# Altium PCB final_arm.PcbDoc
Units mil, origin at the board's own origin, x right, y up, seen from the top; angles counter-clockwise.
Board outline 7091.73 x 6137.99 mil, 2 copper layers (Top Layer, Bottom Layer); 35 components, 57 nets, 275 pads, 0 vias.
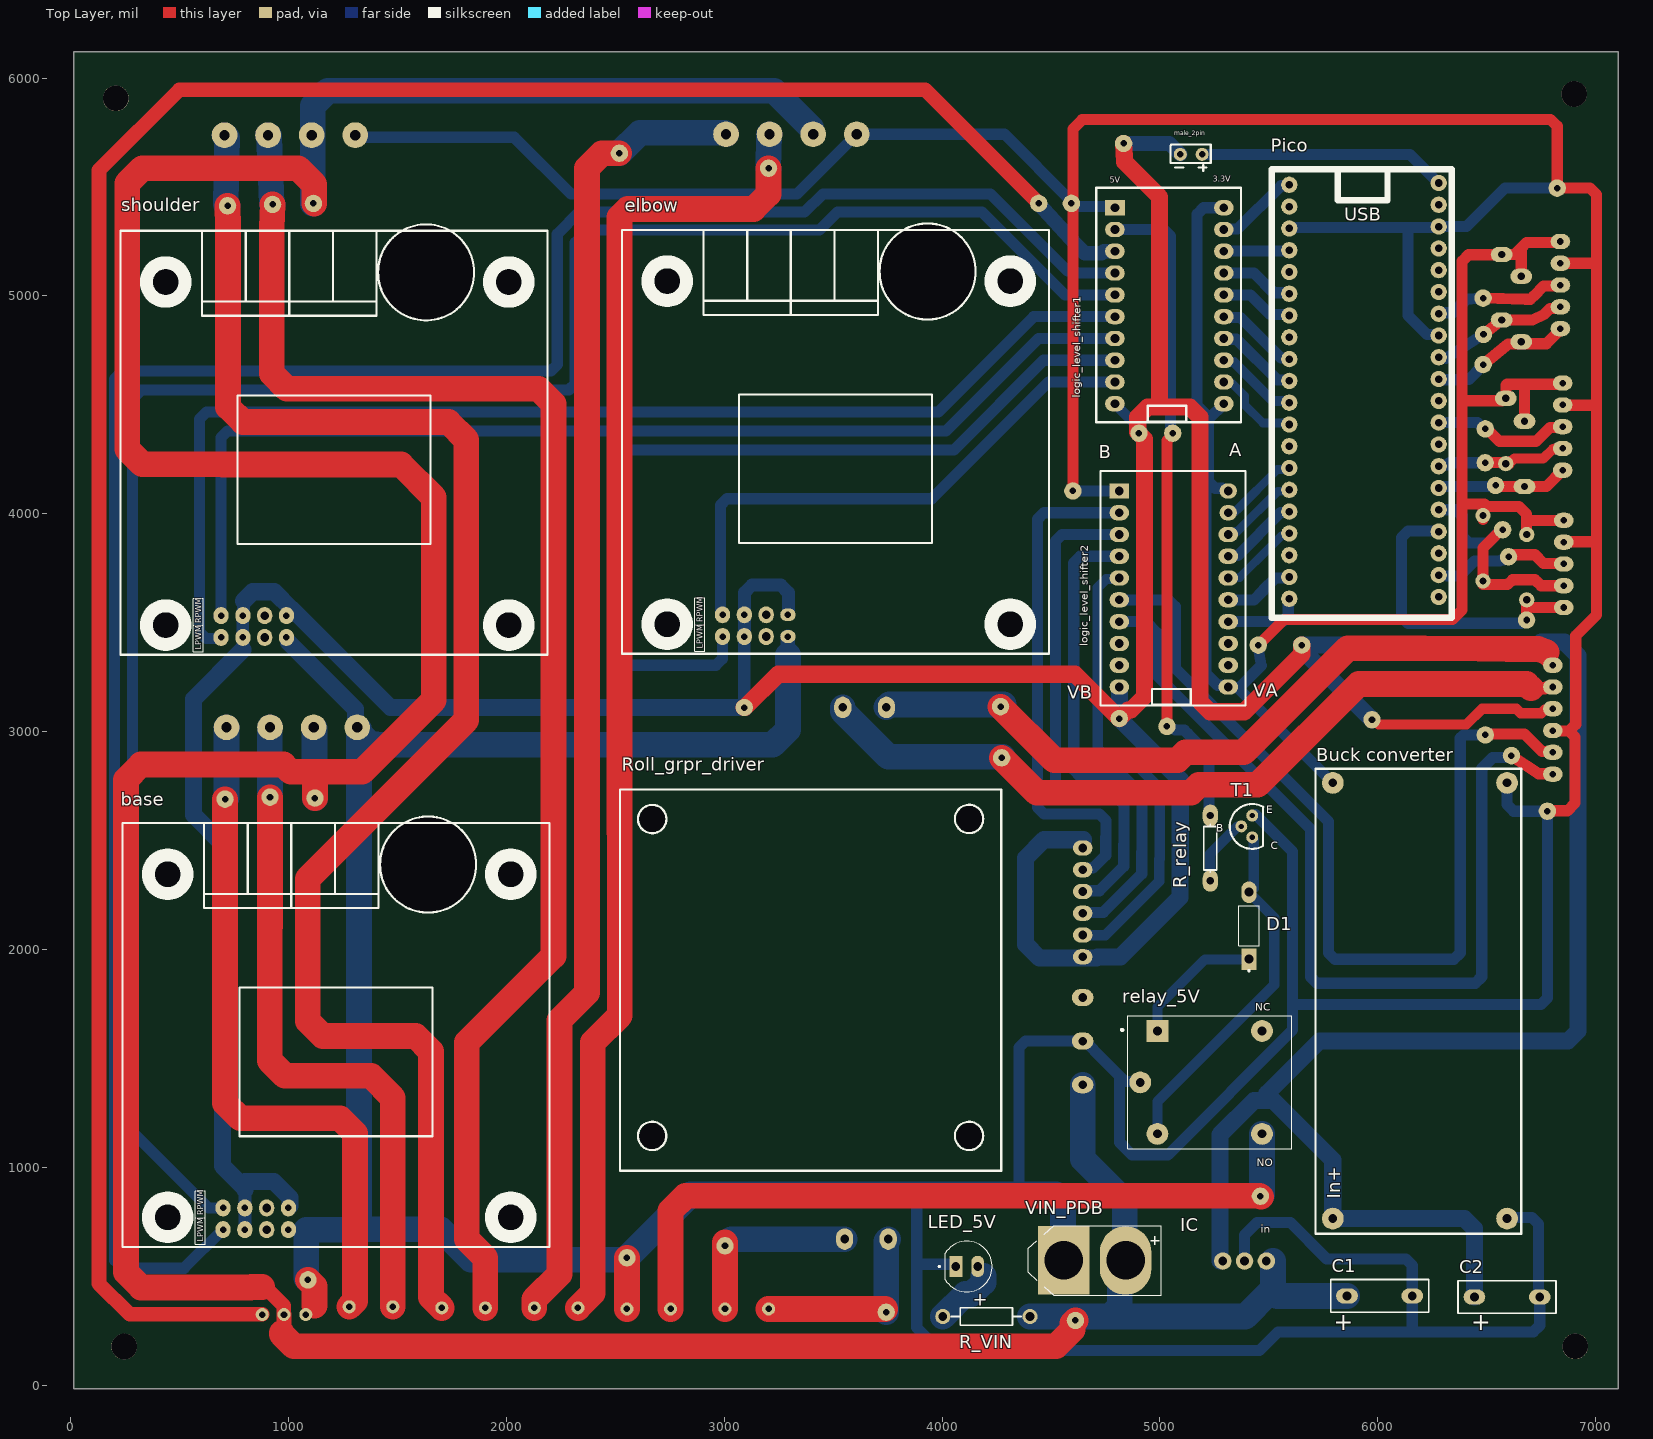
[diagram p0: Top Layer view]
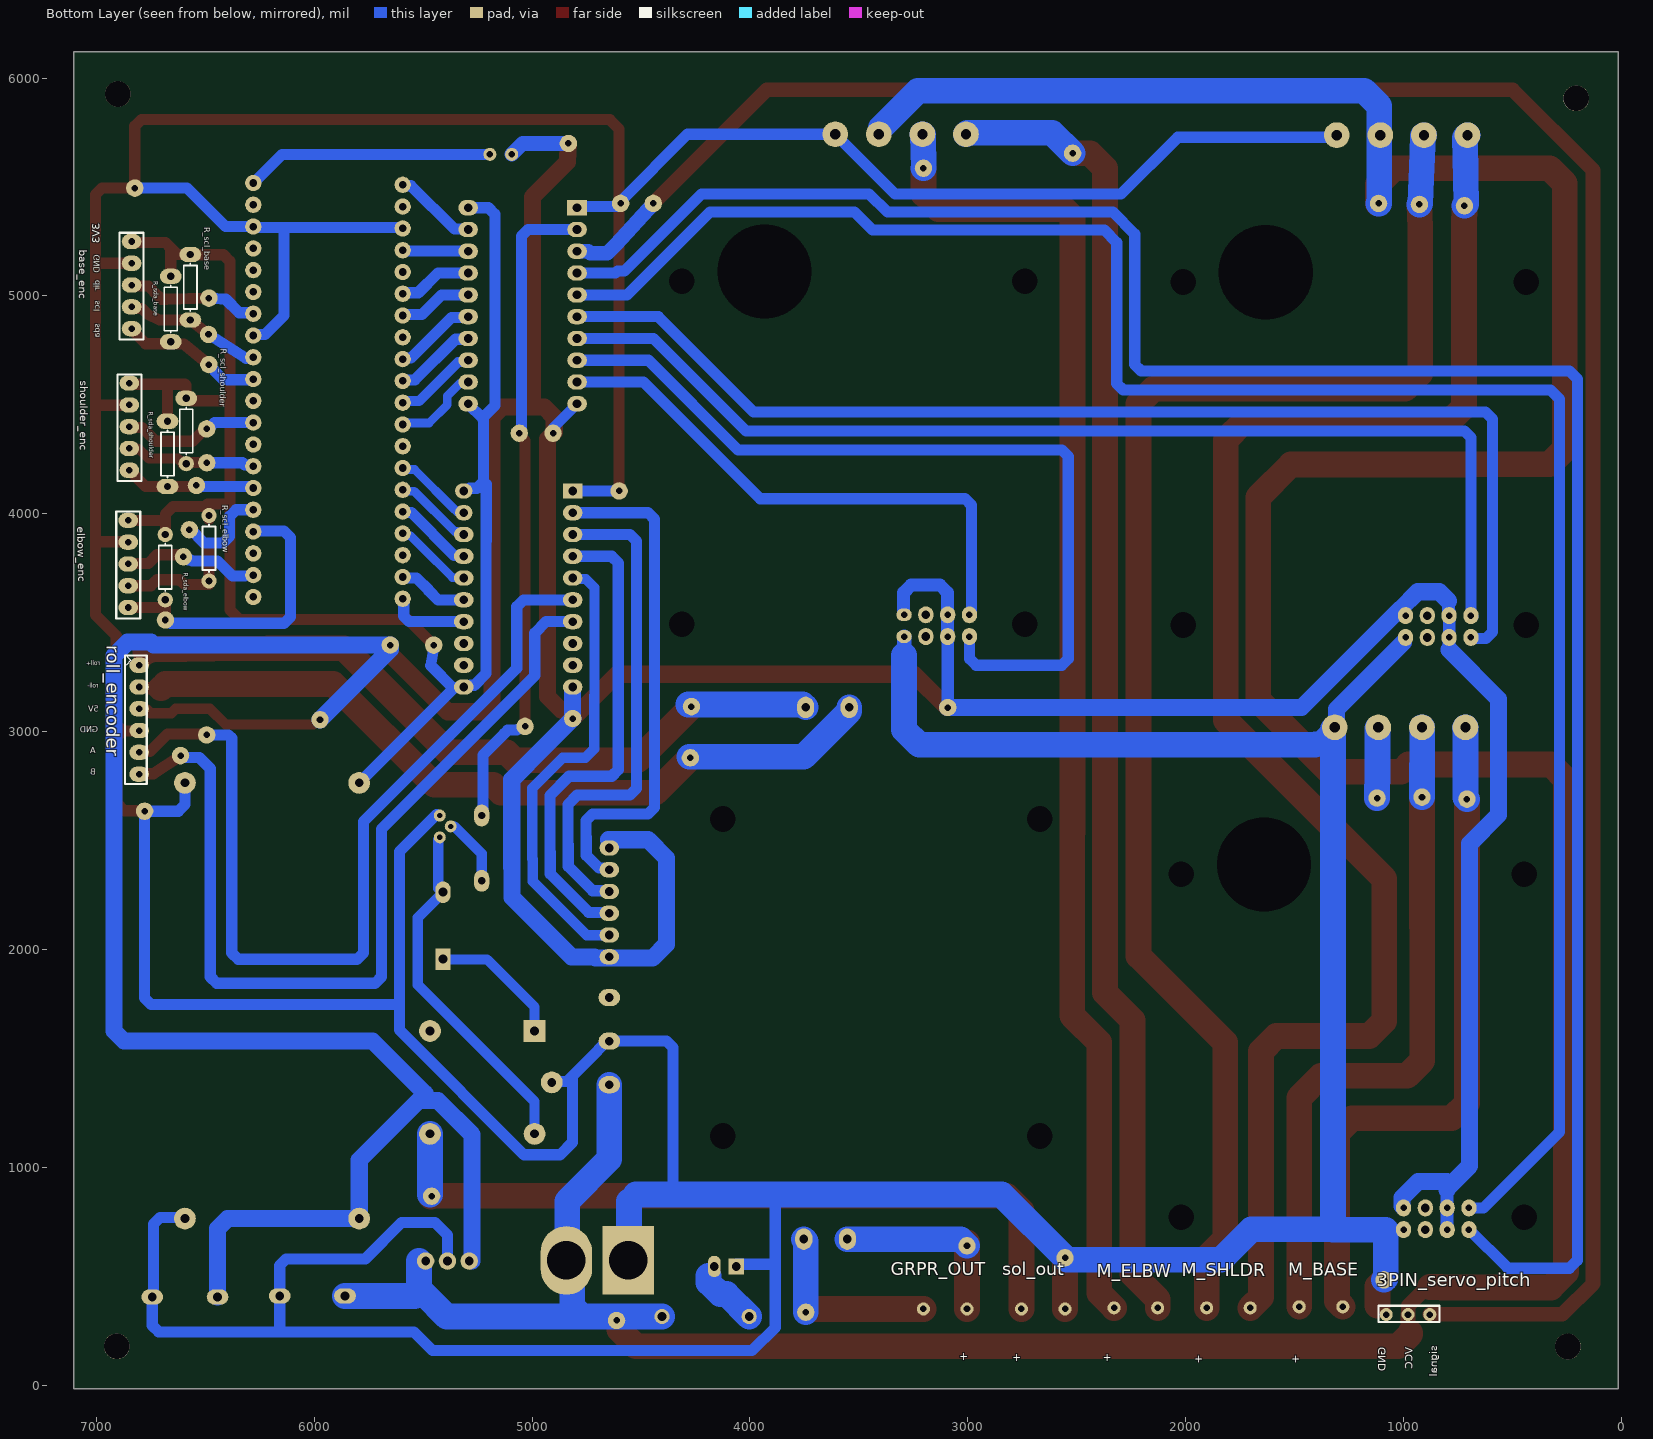
[diagram p1: Bottom Layer view, seen from below]

## Layer stack, top to bottom
Top Solder: solder mask 0.4, Solder Resist, Dk 3.5
Top Layer: signal copper 1.4
Dielectric 1: dielectric 12.6, FR-4, Dk 4.8
Bottom Layer: signal copper 1.4
Bottom Solder: solder mask 0.4, Solder Resist, Dk 3.5

## Board outline
13.31,-16.14 7105.04,-16.14 7105.04,6121.85 13.31,6121.85

## Design rules (kind name [scope] priority, off if disabled: settings)
Clearance [All] p1: gap=31.5 ignorepadtopadclearanceinfootprint=TRUE
Height [All] p1 off: minheight=0 maxheight=1000 prefheight=500
HoleSize [All] p1: absolutevalues=TRUE maxlimit=118.11 minlimit=1 maxpercent=80.000 minpercent=20.000
PolygonConnect [All] p1: connectstyle=Relief reliefconductorwidth=10 reliefentries=4 polygonreliefangle="90 Angle" airgapwidth=10
RoutingVias [All] p1: holewidth=28 width=50 viastyle="Through Hole" minholewidth=28 minwidth=50 maxholewidth=28 maxwidth=50
SolderMaskExpansion [All] p1: expansion=4 istentingtop=FALSE
Width [All] p1: maxlimit=157.48 minlimit=31.5 preferedwidth=39.37
28 further rules are at their usual default settings.

## Classes and differential pairs
net class HV: 12V_VCC BASE_M+ BASE_M- ELBOW_M+ ELBOW_M- SHOULDER_M+ SHOULDER_M-

## Components (designator, comment, footprint, x,y, rotation, side; value= is the part's Value field where it differs from the comment)
3PIN_servo_pitch "JST_3PIN_MALE" JST_3PIN_MALE 879.45,324.29 r0 bottom
base "BTS7960 DRIVER BOARD" BTS7960_DRIVER_BOARD#1 715.55,2389.76 r90 top
base_enc "5_pin_jst" 5pin_jst 6838.74,4849.8 r90 bottom
"Buck converter" "XL4015" XL4015_BL 5793.74,764.8 r90 top
C1 "Cap" RAD-0.3 6008.74,409.8 r0 top value=330pF
C2 "Cap" RAD-0.3 6593.74,404.8 r180 top value=100pF
D1 "1N4007-T" DIOAD780W78L463D236 5408.82,2109.33 r90 top
elbow "BTS7960 DRIVER BOARD" BTS7960_DRIVER_BOARD#2 3008.43,5112.32 r90 top
elbow_enc "5_pin_jst" 5pin_jst 6853.74,3569.8 r90 bottom
GRPR_OUT "KF2510_3P_motor_pin" PCBComponent_1 3003.74,349.8 r0 bottom
IC "LM7805" LM7805 5488.74,569.8 r180 top
LED_5V "L08R5000Q1" LEDRD254W57D500H1070 4113.74,544.8 r0 top
logic_level_shifter1 "TXS0108E 8" llshifter#1 5293.74,4504.8 r180 top
logic_level_shifter2 "TXS0108E 8" llshifter#2 5313.74,3204.8 r180 top
M_BASE "KF2510_3P_motor_pin" PCBComponent_1 1278.74,359.8 r0 bottom
M_ELBW "KF2510_3P_motor_pin" PCBComponent_1 2128.74,354.8 r0 bottom (schematic designator M_ELBOW)
M_SHLDR "KF2510_3P_motor_pin" PCBComponent_1 1703.74,354.8 r0 bottom (schematic designator M_SHOULDER)
male_2pin "alt power pico" 2pin_header 5093.74,5649.8 r0 top
Pico "Component_1_1" "PCBComponent_1 - duplicate" 5918.74,4369.8 r0 top
R_relay "scl_base" AXIAL-0.3#1 5231.61,2465 r90 top value=4.7K
R_scl_base "scl_base" AXIAL-0.3#2 6568.74,5039.8 r90 bottom value=4.7K
R_scl_elbow "" AXIAL-0.3#3 6482.99,3841.85 r90 bottom value=4.7K
R_scl_shoulder "Res1" AXIAL-0.3#4 6587.72,4379.96 r90 bottom value=4.7K
R_sda_base "Res1" AXIAL-0.3#2 6658.74,4939.8 r90 bottom value=4.7K
R_sda_elbow "Res1" AXIAL-0.3#3 6683.74,3754.8 r90 bottom value=4.7K
R_sda_shoulder "" AXIAL-0.3#2 6673.74,4274.8 r90 bottom value=4.7K
R_VIN "Res2" AXIAL-0.4 4203.74,314.8 r0 top value=330
relay_5V "SRD-05VDC-SL-C" RELAY_SRD-05VDC-SL-C 5228.74,1389.8 r0 top
roll_encoder "JST_6PIN_MALE" jst_6pin_male 6803.74,3304.8 r270 bottom
Roll_grpr_driver "L298Nog" l298nog 4094.41,1379.13 r180 top
shoulder "BTS7960 DRIVER BOARD" BTS7960_DRIVER_BOARD#1 706.42,5108.25 r90 top
shoulder_enc "5_pin_jst" 5pin_jst 6848.74,4199.8 r90 bottom
sol_out "KF2510_3P" PCBComponent_1 2553.74,349.8 r0 bottom (schematic designator solenoid_out)
T1 "BC547" TO92 5423.74,2514.8 r90 top
VIN_PDB "XT60 MALE" "XT60 MALE" 4559.02,572.76 r0 top

## Footprints (in the part's own frame and the unit in brackets; to place one, negate y for a bottom-side part, rotate by r counter-clockwise, add the part's x,y. Pads: shape width x height; smd on the part's side, far side on the other; paste and mask are expansions set on the pad)
2pin_header [mil]
  round 60 hole 30: 1(0,0) 2(100,0)
  silkscreen extent -45,-75 140,45, body extent -50,-50 150,50, height 374
5pin_jst [mil]
  oval 70x90 hole 30: 1(0,0) 2(100,0) 3(200,0) 4(300,0) 5(400,0)
  silkscreen extent -50,-55 440,55, body extent -98,-90 489,142, height 281
AXIAL-0.3#1 [mil] "Axial Device, Thru-Hole; 2 Leads; 0.3 in Pin Spacing"
  oval 100x70 hole 33.46: 1(-150,0) 2(150,0)
  silkscreen extent -109,-30 109,30
AXIAL-0.3#2 [mil] "Axial Device, Thru-Hole; 2 Leads; 0.3 in Pin Spacing"
  oval 70x100 hole 33.46: 1(-150,0) 2(150,0)
  silkscreen extent -109,-30 109,30
AXIAL-0.3#3 [mil] "Axial Device, Thru-Hole; 2 Leads; 0.3 in Pin Spacing"
  round 70 hole 33.46: 1(-150,0) 2(150,0)
  silkscreen extent -109,-30 109,30
AXIAL-0.3#4 [mil] "Axial Device, Thru-Hole; 2 Leads; 0.3 in Pin Spacing"
  round 70 hole 33.46: 1(-150,0)
  oval 70x100 hole 33.46: 2(150,0)
  silkscreen extent -109,-30 109,30
AXIAL-0.4 [mil] "Axial Device, Thru-Hole; 2 Leads; 0.4 in Pin Spacing"
  round 70 hole 40: 1(-200,0) 2(200,0)
  silkscreen extent -160,-40 160,40
BTS7960_DRIVER_BOARD#1 [mm]
  oval 1.981x1.778 hole 0.76: 1(-42.567,0.4) 2(-40.027,0.4) 3(-42.567,-2.14) 4(-40.027,-2.14) 7(-42.567,-7.22) 8(-40.027,-7.22)
  oval 1.981x1.778 hole 1.02: 5(-42.567,-4.68) 6(-40.027,-4.68)
  round 3 hole 1.2: 9(16,0) 10(16,-5.08) 11(16,-10.16) 12(16,-15.24)
  round 0 hole 3 unplated: ""(-41.127,-33.14) ""(-41.127,6.86) ""(-1.127,6.86) ""(-1.127,-33.14)
  round 0 all layers, no hole: ""(-23.009,-12.808)
  round 0 hole 11 unplated: ""(0,-23.5)
  silkscreen extent -44.58,-37.64 5.6,12.11, body extent -44.67,-38.45 5.13,12.55, height 25
BTS7960_DRIVER_BOARD#2 [mm]
  oval 1.981x1.778 hole 0.76: 1(-42.567,0.4) 2(-40.027,0.4) 3(-42.567,-2.14) 4(-40.027,-2.14)
  oval 1.981x1.778 hole 1.02: 5(-42.567,-4.68) 6(-40.027,-4.68)
  oval 1.5x1.8 hole 0.76: 7(-42.567,-7.22) 8(-40.027,-7.22)
  round 3 hole 1.2: 9(16,0) 10(16,-5.08) 11(16,-10.16) 12(16,-15.24)
  round 0 hole 3 unplated: ""(-41.127,-33.14) ""(-41.127,6.86) ""(-1.127,6.86) ""(-1.127,-33.14)
  round 0 all layers, no hole: ""(-23.009,-12.808)
  round 0 hole 11 unplated: ""(0,-23.5)
  silkscreen extent -44.58,-37.64 5.6,12.11, body extent -44.67,-38.45 5.13,12.55, height 25
DIOAD780W78L463D236 [mil]
  oval 100x70 hole 41.73: A(153.72,0)
  rect 100x70 hole 41.73: K(-153.72,0)
  silkscreen extent -211,-46 91,46, body extent -216,-53 216,53, height 106
JST_3PIN_MALE [mil]
  round 60 hole 30: 1(0,0) 2(100,0) 3(200,0)
  silkscreen extent -45,-40 235,35, body extent -92,-98 292,132, height 284
jst_6pin_male [mil]
  oval 70x90 hole 30: 1(0,0) 2(100,0) 3(200,0) 4(300,0) 5(400,0) 6(500,0)
  silkscreen extent -45,-65 545,35, body extent -82,-100 602,130, height 284
l298nog [mm]
  oval 2x2.5 hole 1.02: 1(13.75,18) 2(8.67,18) 14(8.89,-44) 15(13.97,-44)
  oval 2.5x2 hole 1.02: 3(-14,0) 4(-14,-5.08) 5(-14,-10.16)
  oval 2.286x1.778 hole 1.016: 7(-14,-14.91) 8(-14,-17.45) 9(-14,-19.99) 10(-14,-22.53) 11(-14,-25.07) 12(-14,-27.61)
  round 0 hole 3 unplated: ""(-0.762,5.969) ""(-0.762,-30.988) ""(36.195,5.969) ""(36.195,-30.988)
  silkscreen extent -4.5,-34.42 39.95,10.03, body extent -16.33,-46.06 39.87,20.4, height 26.52
LEDRD254W57D500H1070 [mm]
  oval 1.5x2.5 hole 1: A(1.27,0)
  rect 1.5x2.5 / inner round 1.815 / far side rect 1.815x1.815 hole 1: C(-1.27,0)
  silkscreen extent -3.3,-2.96 2.96,2.96, body extent -2.6,-2.95 2.95,2.95, height 9.1
llshifter#1 [mil]
  oval 90x70 hole 40: 1(0,0) 2(0,-100) 3(0,-200) 4(0,-300) 5(0,-400) 6(0,-500) 7(0,-600) 8(0,-700) 9(0,-800) 10(0,-900) 12(500,-800) 13(500,-700) 14(500,-600) 15(500,-500) 16(500,-400) 17(500,-300) 18(500,-200) 19(500,-100) 20(500,0)
  rect 90x70 hole 40: 11(500,-900)
  silkscreen extent -79,-992 586,85, body extent -68,-987 578,60, height 117
llshifter#2 [mil]
  oval 90x70 hole 40: 1(0,0) 2(0,-100) 3(0,-200) 4(0,-300) 5(0,-400) 6(0,-500) 7(0,-600) 8(0,-700) 12(500,-800) 13(500,-700) 14(500,-600) 15(500,-500) 16(500,-400) 17(500,-300) 18(500,-200) 19(500,-100) 20(500,0)
  oval 80x70 hole 40: 9(0,-800) 10(0,-900)
  rect 90x70 hole 40: 11(500,-900)
  silkscreen extent -79,-992 586,85, body extent -68,-987 578,60, height 117
LM7805 [mil]
  round 80 hole 40.16: 1(0,0) 2(100,0) 3(200,0)
  body extent -174,-107 405,307, height 1022
PCBComponent_1 [mil]
  round 60 hole 30: 1(0,0) 2(200,0)
  body extent -62,-110 272,126, height 492
"PCBComponent_1 - duplicate" [mm]
  round 1.905 hole 0.889: 1(-8.245,28.96) 1(-8.245,28.96) 2(-8.245,26.42) 3(-8.245,23.88) 4(-8.245,21.34) 5(-8.245,18.8) 6(-8.245,16.26) 7(-8.245,13.72) 8(-8.245,11.18) 9(-8.245,8.64) 10(-8.245,6.1) 11(-8.245,3.56) 12(-8.245,1.02) 13(-8.245,-1.52) 14(-8.245,-4.06) 15(-8.245,-6.6) 16(-8.245,-9.14) 17(-8.245,-11.68) 18(-8.245,-14.22) 19(-8.245,-16.76) 20(-8.245,-19.3) 21(9.17,29.173) 21(9.17,29.173) 22(9.17,26.633) 23(9.17,24.093) 24(9.17,21.553) 25(9.17,19.013) 26(9.17,16.473) 27(9.17,13.933) 28(9.17,11.393) 29(9.17,8.853) 30(9.17,6.313) 31(9.17,3.773) 32(9.17,1.233) 33(9.17,-1.307) 34(9.17,-3.847) 35(9.17,-6.387) 36(9.17,-8.927) 37(9.17,-11.467) 38(9.17,-14.007) 39(9.17,-16.547) 40(9.17,-19.087)
  silkscreen extent -10.28,-21.54 10.68,30.79, body extent -9.96,-20.4 11.03,32.03, height 4.19
RAD-0.3 [mil] "Radial Cap, Thru-Hole; 2 Leads; 0.3 in Pin Spacing"
  oval 100x70 hole 40: 1(-150,0) 2(150,0)
  silkscreen extent -225,-75 225,75
RELAY_SRD-05VDC-SL-C [mm]
  rect 2.54x2.54 hole 1.016: A1(-6.1,6)
  round 2.54 hole 1.016: A2(-6.1,-6) COM(-8.1,0) NC(6.1,6) NO(6.1,-6)
  silkscreen extent -10.3,-7.75 9.55,7.75, body extent -9.6,-7.8 9.6,7.8, height 15.8
TO92 [mil]
  round 55 hole 24: 1(0,0) 2(50,50) 3(100,0)
  silkscreen extent -53,-51 153,103, body extent -111,-56 111,86, height 345
XL4015_BL [mil]
  round 100 hole 40: 1(0,0) 2(0,-800) 3(2000,0) 4(2000,-800)
  silkscreen extent -70,-865 2065,80, body extent -71,-868 2055,77, height 578
"XT60 MALE" [mm]
  rect 6x8 hole 4.5: 1(0,0)
  oval 6x8 hole 4.5: 2(7.2,0)
  silkscreen extent -4.15,-4.05 11.35,4.05, body extent -4.52,-4.08 11.38,4.07, height 16.5

## Part data
3PIN_servo_pitch: "JST 3PIN 2.54mm male"
base elbow shoulder: "MOTOR DRIVER, 12 PIN"
C1 C2: "Capacitor", LatestRevisionDate=17-Jul-2002, LatestRevisionNote="Re-released for DXP Platform.", PackageDescription="Radial Cap, Thru-Hole; 2 Leads; 0.3 in Pin Spacing", PackageReference=RAD-0.3, Published=8-Jun-2000, Publisher="Altium Limited"
D1: "Diode Standard 1A 1000V 1Vf DO41", Package="DO-41 Diodes Inc.", Check_prices=https://www.snapeda.com/parts/1N4007-T/Diodes+Inc./view-part/?ref=eda, MF="Diodes Incorporated", MP=1N4007-T, SnapEDA_Link=https://www.snapeda.com/parts/1N4007-T/Diodes+Inc./view-part/?ref=snap
GRPR_OUT M_BASE M_ELBW M_SHLDR sol_out: library part Component_1
LED_5V: "LED, 5MM, ORANGE; LED / Lamp Size: 5mm / T-1 3/4; LED Colour: Orange; Typ Luminous Intensity: 4.3mcd; Viewing Angle: ...", Package=None, Availability="In Stock", Check_prices=https://www.snapeda.com/parts/L08R5000Q1/LED+Technology/view-part/?ref=eda, MF="LED Technology", MP=L08R5000Q1, Price=None, SnapEDA_Link=https://www.snapeda.com/parts/L08R5000Q1/LED+Technology/view-part/?ref=snap
logic_level_shifter1 logic_level_shifter2: "8ch logic level converter"
male_2pin: library part Component_1, "2 pin header"
R_relay R_scl_base R_scl_elbow R_sda_shoulder: library part Res1, "Resistor", LatestRevisionDate=17-Jul-2002, LatestRevisionNote="Re-released for DXP Platform.", PackageDescription="Axial Device, Thru-Hole; 2 Leads; 0.3 in Pin Spacing", PackageReference=AXIAL-0.3, Published=8-Jun-2000, Publisher="Altium Limited"
R_scl_shoulder R_sda_base R_sda_elbow R_VIN: "Resistor", LatestRevisionDate=17-Jul-2002, LatestRevisionNote="Re-released for DXP Platform.", Published=8-Jun-2000, Publisher="Altium Limited"
  R_scl_shoulder R_sda_base R_sda_elbow: PackageDescription="Axial Device, Thru-Hole; 2 Leads; 0.3 in Pin Spacing", PackageReference=AXIAL-0.3
  R_VIN: PackageDescription="Axial Device, Thru-Hole; 2 Leads; 0.4 in Pin Spacing", PackageReference=AXIAL-0.4
relay_5V: "5V Trigger Relay Module For Arduino And Raspberry Pi 5V Trigger Relay Module For Arduino And Raspberry Pi", Package="NON STANDARD-5 Songle Relay", Availability="Not in stock", Check_prices=https://www.snapeda.com/parts/SRD-05VDC-SL-C/Songle+Relay/view-part/?ref=eda, MF="Songle Relay", MP=SRD-05VDC-SL-C, Price=None, SnapEDA_Link=https://www.snapeda.com/parts/SRD-05VDC-SL-C/Songle+Relay/view-part/?ref=snap
roll_encoder: "JST 6PIN MALE 2.54mm"
Roll_grpr_driver: "MOTOR DRIVER BOARD, 15 PIN"
T1: "Trans GP BJT NPN 45V 0.1A 500mW 3-Pin TO-92 T/R", Package=None, Check_prices=https://www.snapeda.com/parts/BC547/Onsemi/view-part/?ref=eda, MF="ON Semiconductor", MP=BC547, SnapEDA_Link=https://www.snapeda.com/parts/BC547/Onsemi/view-part/?ref=snap
VIN_PDB: "CONNECTOR"

## Free pads (board coordinates)
  round 80 hole 30: 16(4443.74,5424.8) 17(708.86,2690.12) 18(915.24,2699.17) 19(720.24,5413.66) 21(927.13,5420.16) 22(2518.74,5654.8) 23(3203.66,5586.18) 26(3003.74,639.8) 27(3743.74,334.8) 28(5461.24,867.3) 29(1089.51,483.46) 32(2553.74,584.8) 33(4612.32,297.01) 34(6778.74,2634.8) 35(6613.74,2889.8) 37(4273.74,2879.8) 38(4268.74,3114.8) 41(5058.74,4369.8) 44(4813.74,3059.8) 45(5973.74,3054.8) 46(5651.18,3397.36) 47(6493.74,2984.8) 48(6823.74,5494.8) 49(6600.71,3802.64) 50(6683.31,3512.44) 51(6573.5,3926.93) 52(6540.98,4130.12) 53(6493.19,4234.17) 54(6493.74,4389.8) 55(6483.74,4989.8) 56(6485.47,4823.31) 57(6483.74,4684.8) 59(4600.41,4104.8) 60(4593.74,5424.8) 61(4903.74,4369.8) 62(4833.74,5699.8) 63(5451.73,3397.05) 64(3092.19,3110.62) 65(1121.5,2694.84) 66(1114.57,5424.45) 67(5032.4,3024.25)
  round 118.11 hole 118.11: 68(207.4,5907.05) 68(245.79,177.2) 68(6902.24,5926.77) 68(6906.61,178.39)

## Nets (pads, with @x,y where several pads share a name; then routed paths per layer and width w, separated by ;. In a path a pad name is that pad's centre, name@x,y a point inside that pad or via, vN(x,y) a via of type N, cw(c..) or ccw(c..) an arc to the next point about the centre after c; other vN are vias at no path point)
3V3_VCC: "Buck converter.3" base_enc.5 elbow_enc.5 logic_level_shifter1.1 logic_level_shifter1.10 logic_level_shifter2.1 logic_level_shifter2.10 pad.63 R_scl_base.2 R_scl_elbow.2 R_scl_shoulder.2 R_sda_base.2 R_sda_elbow.2 R_sda_shoulder.2 shoulder_enc.5 | length 8045.8
  Top Layer w51.18: pad.63 5570.06,3515.37 6343.51,3515.37 6386.65,3558.52 6386.65,4045.03 ; 6388.19,4518.86 6569.91,4518.86 6575.85,4524.8 6581.49,4524.8 6585.9,4529.21 6587.4,4529.21 R_scl_shoulder.2@6588.47,4528.14 ; R_scl_elbow.2@6483.74,3974.8 6482.99,3975.55 6482.99,4044.76 6482.72,4045.03 ; R_scl_shoulder.2@6589.49,4525.56 6589.49,4590.56 6593.74,4594.8 6841.35,4594.8 6844.67,4598.12 shoulder_enc.5@6846.35,4598.12 ; R_sda_base.2 6658.74,5220.46 ; R_sda_shoulder.2 6673.74,4589.8 ; R_sda_elbow.2 6682.99,3905.56 6682.99,3969.8 ; base_enc.5@6841.38,5246.69 6839.95,5248.12 6834.67,5248.12 6831.35,5244.8 6683.08,5244.8 6658.74,5220.46 ; elbow_enc.5 6682.99,3969.8 ; 6386.65,4045.03 6482.72,4045.03 ; 6386.65,4045.03 6386.65,5159.07 6416.63,5189.05 6567.99,5189.05 R_scl_base.2 6628.08,5189.8 6658.74,5220.46 ; 6482.72,4045.03 6488.77,4045.03 6501.08,4032.72 6648.24,4032.72 6682.99,3997.97 6682.99,3969.8
  Bottom Layer w51.18: 5210.75,4135.88 5210.75,3875.31 5211.65,3874.41 5211.65,3266.66 5265.6,3212.72 5282.52,3212.72 5286.83,3208.4 5310.14,3208.4 logic_level_shifter2.1 ; logic_level_shifter1.1@5291.62,4501.92 5228.74,4439.04 5223.03,4444.75 ; logic_level_shifter1.10 5199.74,5404.8 5169.76,5374.82 5169.76,4498.02 5223.03,4444.75 ; logic_level_shifter2.10@5295.05,4108.4 5286.14,4117.31 5253.01,4117.31 5223.03,4147.29 5223.03,4444.75 ; logic_level_shifter2.1@5313.04,3203.12 5355.43,3203.12 5359.82,3198.72 ; pad.63 5449.21,3393.42 5465.28,3304.17 5359.82,3198.72 ; 5793.74,2764.8 5569.91,2988.63 5359.82,3198.72
5V_VCC: "Buck converter.1" base.3 base.4 base.8 C2.2 elbow.3 elbow.4 elbow.8 IC.3 logic_level_shifter1.20 logic_level_shifter2.20 male_2pin.1 pad.44 pad.45 pad.46 pad.61 pad.62 pad.64 roll_encoder.3 Roll_grpr_driver.7 Roll_grpr_driver.12 shoulder.3 shoulder.4 shoulder.8 | length 25224
  Top Layer w47.24: pad.45 5982.6,3054.8 6004.73,3032.68 6407.1,3032.68 6479.22,3104.8 6635.93,3104.8 6655.73,3085 6750.31,3085 6765.76,3100.45 6795.93,3100.45 roll_encoder.3@6800.29,3104.8
  Top Layer w78.74: pad.64 3095,3110.43 3248.23,3263.66 4609.88,3263.66 pad.44 4814.08,3059.8 4853.21,3098.94 4867.59,3098.94 4929.61,3160.95 4929.61,4343.6 4903.98,4369.22 4903.98,4369.66 4903.5,4370.14 4903.5,4370.39 4898.35,4375.54 4898.35,4443.68 4944.47,4489.8 4998.74,4489.8 ; pad.62 4838.74,5614.8 4998.74,5454.8 4998.74,4489.8 ; pad.46 5650.94,3397.12 5650.94,3355.51 5387.01,3091.57 5229.87,3091.57 5183.74,3137.7 5183.74,4443.68 5137.62,4489.8 4998.74,4489.8
  Bottom Layer w47.24: logic_level_shifter1.20 4901.3,4397.24 4901.3,4372.24 pad.61
  Bottom Layer w59.06: shoulder.4@790,3552.66 790,3442.87 790.67,3442.2 shoulder.3 790.67,3375.59 ; shoulder.4@792.83,3537.09 792.83,3598.84 ; base.3 base.4 799.8,895.51 ; pad.64 3092.19,3378.85 3092.36,3379.02 3092.36,3426.28 3092.68,3426.59 elbow.3 elbow.4 3092.68,3637.93 3127.27,3672.52 3260.01,3672.52 3294.61,3637.93 3294.61,3536.44 elbow.8
  Bottom Layer w66.93: pad.62 5043.74,5699.8 male_2pin.1
  Bottom Layer w78.74: 790.67,3375.59 564.13,3149.06 564.13,2618.23 696.51,2485.85 696.51,1007.58 721.6,982.48 799.8,904.28 799.8,895.51 ; 792.83,3598.84 836.22,3642.23 934.52,3642.23 1016.59,3560.16 1018.46,3560.16 1468,3110.62 pad.64 ; 799.8,934.92 932.48,934.92 943.65,923.74 1007.09,860.31 base.8@1007.09,823.5 ; Roll_grpr_driver.12@4645.59,2472.01 4645.59,2500.08 4649.09,2503.58 4467.35,2503.58 4383.78,2420.02 4383.78,2023.53 4447.03,1960.28 4708.04,1960.28 4713.91,1966.14 4819.31,1966.14 5091.77,2238.6 5091.77,2374.59 5093.82,2376.64 5093.82,2779.72 4940,2933.54 pad.44 4813.98,3060.04 logic_level_shifter2.20@4813.98,3187.01 ; IC.3@5275.24,569.8 5275.24,1149.23 5432.16,1306.15 5505.63,1306.15 ; pad.46 5651.18,3377.36 pad.45 ; pad.46@5651.52,3397.36 6736.58,3397.36 6749.89,3410.67 6857.59,3410.67 6919.61,3348.65 6919.61,1625.93 6873.48,1579.8 5732.37,1579.8 5505.63,1353.07 5489.88,1337.32 5793.74,1033.46 5793.74,764.8 6397.62,764.8 6443.74,718.68 C2.2
12V_VCC: 3PIN_servo_pitch.2 base.11 C1.1 elbow.11 IC.1 pad.33 pad.65 pad.66 R_VIN.2 Roll_grpr_driver.3 shoulder.11 VIN_PDB.2 | length 19405.5
  Top Layer w51.18: 871.61,450.79 889.33,433.07 ; 3PIN_servo_pitch.2@977.94,325.8 3PIN_servo_pitch.2 ; 1091.51,2815.32 1121.5,2785.33
  Top Layer w66.93: 878.89,448.82 893.92,448.82 977.94,364.8 3PIN_servo_pitch.2@977.94,325.8 ; 979.45,224.09 3PIN_servo_pitch.2
  Top Layer w118.11: 878.89,450.79 871.61,450.79 829,450.79 827.03,448.82 323.28,448.82 254.09,518.01 254.09,2779.59 323.28,2848.78 977.21,2848.78 1010.67,2815.32 1091.51,2815.32 1337.91,2815.32 1666.22,3143.62 1666.22,4076.34 1516.54,4226.02 698.31,4226.02 697.38,4226.95 329.19,4226.95 260,4296.14 260,5516.88 329.19,5586.06 1045.38,5586.06 1118.9,5512.54 pad.66@1118.9,5424.45 ; 969.42,239.76 969.42,234.13 1024.92,178.62 4523.35,178.62 4598.74,254.01 4598.74,283.43 pad.33 ; pad.65 1121.5,2785.33
  Bottom Layer w51.18: base.11 base.11@1119.81,3015.43 ; IC.1 5494.25,564.29 5494.25,520.28 ; 5494.25,416.66 5494.25,435.47 ; 5513.07,435.47 5538.74,409.8
  Bottom Layer w118.11: pad.66 1110.79,5424.45 1110.79,5738.17 1110.79,5872.98 1179.97,5942.17 3228.36,5942.17 elbow.11@3399.5,5771.03 ; base.11@1119.81,3015.43 1119.81,2822.59 pad.65 ; R_VIN.2 4769.63,314.8 ; Roll_grpr_driver.3 4645.59,1037.95 4838.74,844.8 4838.74,636.96 4876.11,599.59 4838.74,562.21 4838.74,554.8 4816.14,532.2 4816.14,361.31 4769.63,314.8 ; 5494.25,416.66 5392.4,314.8 4769.63,314.8 ; 5519.29,429.25 IC.1@5519.29,569.8 ; 5538.74,409.8 C1.1
alt_power: male_2pin.2 Pico.21 | length 1140.5
  Bottom Layer w51.18: male_2pin.2 6148.31,5649.8 Pico.21@6279.76,5518.35
BASE_LPWM_3.3V: logic_level_shifter1.7 Pico.6 | length 339.7
  Bottom Layer w51.18: logic_level_shifter1.7 5432.44,5104.8 5522.72,5014.52 5589.58,5014.52 Pico.6
BASE_LPWM_5V: base.1 logic_level_shifter1.14 | length 10077.1
  Bottom Layer w51.18: base.1 698.45,713.88 521.42,536.85 238.72,536.85 201.81,573.76 201.81,4617.89 238.72,4654.8 2203.86,4654.8 2233.84,4684.78 2233.84,5284.59 2333.78,5384.53 3368.93,5384.53 3453.03,5468.62 4222.41,5468.62 4576.94,5114.09 4608.74,5114.09 4617.25,5105.59 4792.95,5105.59 logic_level_shifter1.14
BASE_M+: base.10 M_BASE.2 pad.18 | length 3126.5
  Top Layer w118.11: pad.18 913.74,1488.99 982.93,1419.8 1378.74,1419.8 1478.74,1319.8 M_BASE.2
  Bottom Layer w118.11: pad.18 913.74,3017.87 base.10
BASE_M-: base.9 M_BASE.1 pad.17 | length 3194.5
  Top Layer w118.11: pad.17 708.86,1293.99 778.05,1224.8 1236.56,1224.8 1305.75,1155.62 1305.75,386.81 M_BASE.1
  Bottom Layer w118.11: pad.17 715.55,2696.81 base.9 base.9@718.79,3016.04
BASE_RPWM_3.3V: logic_level_shifter1.6 Pico.7 | length 339.7
  Bottom Layer w51.18: logic_level_shifter1.6 5415.51,5004.8 5505.8,4914.52 5589.58,4914.52 Pico.7
BASE_RPWM_5V: base.2 logic_level_shifter1.15 | length 9326.4
  Bottom Layer w51.18: base.2 633.64,813.88 284.49,1163.03 284.49,4527.34 325.34,4568.19 2286.53,4568.19 2316.52,4598.17 2316.52,5245.73 2372.64,5301.85 3436.46,5301.85 3520.55,5385.94 4182.6,5385.94 4563.74,5004.8 logic_level_shifter1.15
dir_base: base_enc.3 pad.55 Pico.27 | length 603.7
  Top Layer w51.18: pad.55 6678.29,4984.99 6700.12,4984.99 6716.44,5000.02 6761.23,5044.8 base_enc.3@6831.27,5044.8
  Bottom Layer w51.18: Pico.27 6284.32,4922.9 6344.45,4922.9 6406.35,4984.8 pad.55
dir_elbow: elbow_enc.3 pad.49 Pico.39 | length 597.6
  Top Layer w51.18: pad.49 6601.61,3811.93 6721.38,3811.93 6761.82,3771.49 6849.67,3771.49 6851.35,3769.8 elbow_enc.3@6851.35,3768.12
  Bottom Layer w51.18: 6318.09,3713.79 6374.7,3713.79 6444.84,3783.94 6561.63,3783.94 6565.92,3788.23 6578.5,3788.23 6592.91,3802.64 pad.49
dir_shoulder: pad.54 Pico.32 shoulder_enc.3 | length 628.2
  Top Layer w51.18: pad.54 6501.54,4389.8 6558.63,4332.72 6726.88,4332.72 6790.37,4396.2 6841.07,4396.2 shoulder_enc.3@6844.67,4399.8
  Bottom Layer w51.18: Pico.32 6457.4,4418.35 6485.94,4389.8 pad.54
ELBOW_LPWM_3.3V: logic_level_shifter1.3 Pico.11 | length 406
  Bottom Layer w46: logic_level_shifter1.3 5297.34,4701.2 5320.65,4701.2 5324.96,4696.89 5339.59,4696.89 5355.55,4680.93 5519.7,4516.78 5579.95,4516.78 5594.13,4502.6 Pico.11 5588.39,4509.96 Pico.11@5582.22,4516.13
ELBOW_LPWM_5V: elbow.1 logic_level_shifter1.18 | length 3946.8
  Bottom Layer w51.18: elbow.1 2992.68,3334.78 2962.7,3304.8 2568.72,3304.8 2538.74,3334.78 2538.74,4263.21 2568.72,4293.19 4054.65,4293.19 4466.27,4704.8 logic_level_shifter1.18
ELBOW_M+: elbow.10 M_ELBW.2 pad.23 | length 6089.6
  Top Layer w118.11: M_ELBW.2 2397.28,423.35 2397.28,1573.35 2520.35,1696.42 2520.35,2536.61 2519.8,2537.16 2519.8,5360.94 2557.83,5398.98 3134.47,5398.98 3203.66,5468.16 pad.23
  Bottom Layer w118.11: pad.23 3202.73,5587.15 3205.72,5739.64 elbow.10
ELBOW_M-: elbow.9 M_ELBW.1 pad.22 | length 6040
  Top Layer w118.11: M_ELBW.1 2128.74,394.8 2243.74,509.8 2243.74,1674.8 2370.2,1801.26 2370.2,5585.62 2439.38,5654.8 pad.22
  Bottom Layer w118.11: pad.22 2613.46,5749.53 3001.14,5749.53 elbow.9
ELBOW_RPWM_3.3V: logic_level_shifter1.2 Pico.12 | length 404.9
  Bottom Layer w39.37: logic_level_shifter1.2 5299.6,4598.94 5331.26,4598.94 5339.22,4590.98 5339.44,4590.98 5389.92,4540.5 5389.92,4499.84 5472.99,4416.78 5587.32,4416.78 Pico.12@5589.58,4414.52
  Bottom Layer w51.18: Pico.12@5589.58,4414.52 Pico.12
ELBOW_RPWM_5V: elbow.2 logic_level_shifter1.19 | length 2543.5
  Bottom Layer w51.18: elbow.2@2983.75,3539.96 2983.75,4039.14 3013.73,4069.12 3953.08,4069.12 4488.76,4604.8 logic_level_shifter1.19
GND: 3PIN_servo_pitch.3 "Buck converter.2" "Buck converter.4" base.7 base.12 base_enc.4 C1.2 C2.1 elbow.7 elbow.12 elbow_enc.4 IC.2 LED_5V.C logic_level_shifter1.11 logic_level_shifter2.11 pad.29 pad.32 pad.34 pad.48 pad.59 pad.60 Pico.3 Pico.23 Pico.28 relay_5V.COM roll_encoder.4 Roll_grpr_driver.4 shoulder.7 shoulder.12 shoulder_enc.4 sol_out.1 T1.3 VIN_PDB.1 | length 35547.5
  Top Layer w51.18: pad.32@2543.74,597.19 2553.74,587.19 pad.32 ; pad.59 4600.41,5766.47 4643.74,5809.8 6793.76,5809.8 6823.74,5779.82 pad.48 6973.76,5494.8 7003.74,5464.82 7003.74,5149.8 ; pad.34 6780.43,2636.49 6870.22,2636.49 6905.83,2672.1 6905.83,2976.05 6878.76,3003.12 ; roll_encoder.4@6807.81,3003.12 6878.76,3003.12 ; base_enc.4 7003.74,5149.8 ; shoulder_enc.4@6853.74,4499.8 6855.43,4498.12 7002.05,4498.12 7003.74,4499.8 ; elbow_enc.4@6857.81,3871.49 7003.74,3871.49 ; 6878.76,3003.12 6908.74,3033.1 6908.74,3439.8 7003.74,3534.8 7003.74,3871.49 ; 7003.74,3871.49 7003.74,4499.8 ; 7003.74,4499.8 7003.74,5149.8
  Top Layer w118.11: pad.29 1118.98,453.99 1118.98,365.04 ; sol_out.1 pad.32@2553.74,583.55
  Bottom Layer w51.18: base.7 1082.09,713.88 ; shoulder.12 1316.32,5728.27 2036.36,5728.27 2297.42,5467.2 3334.69,5467.2 3608.43,5740.94 elbow.12 4286.3,5742.24 4592.05,5436.49 4592.05,5426.49 pad.60 4596.13,5424.8 4611.13,5409.8 4764.93,5409.8 4765.52,5409.21 4789.33,5409.21 logic_level_shifter1.11 ; 3292.68,3350.21 3303.83,3339.06 ; 3883.66,874.82 3883.66,554.8 ; LED_5V.C@4063.74,554.8 3883.66,554.8 ; 4353.74,874.82 4353.74,1549.82 4383.72,1579.8 4644.92,1579.8 Roll_grpr_driver.4 4655.43,1579.13 4739.25,1495.32 4815.04,1419.53 ; 4523.72,874.82 4555.28,843.27 ; pad.59 logic_level_shifter2.11 ; relay_5V.COM 4905.06,1394.59 4839.98,1394.59 4815.04,1419.53 ; IC.2 5388.74,689.8 5446.16,747.22 5598.6,747.22 5766.02,579.8 6128.76,579.8 6158.74,549.82 C1.2 6158.74,243.94 ; T1.3@5438.36,2619.8 5609.06,2449.11 5609.06,1747.72 5608.39,1747.05 ; Pico.3 5598.33,5314.15 6138.74,5314.15 ; Pico.28 6275.21,4822.9 6226.03,4822.9 6138.74,4910.2 6138.74,5314.15 ; 6593.74,764.8 6598.74,769.8 6708.76,769.8 6738.74,739.82 6738.74,409.8 C2.1 6743.74,273.92 6713.76,243.94 6158.74,243.94 ; 6593.74,2764.8 6593.74,2664.78 6623.72,2634.8 pad.34 6778.74,1777.03 6748.76,1747.05 5608.39,1747.05 ; pad.48 6583.74,5494.8 6407.28,5318.35 Pico.23 6275.57,5314.15 6138.74,5314.15 ; 3883.66,554.8 3883.66,265.07 3990.18,158.54 5457.3,158.54 5542.69,243.94 6158.74,243.94 ; 4815.04,1419.53 4815.04,1115.08 4872.6,1057.52 5036.25,1057.52 5608.39,1629.66 5608.39,1747.05
  Bottom Layer w66.93: 3292.68,3350.21 elbow.7
  Bottom Layer w78.74: shoulder.7@1000.14,3410.45 1308.02,3102.57 base.12@1308.02,3030.3 ; base.12 1326.2,3019.69 1404.59,2941.3
  Bottom Layer w118.11: pad.29 1082.09,490.88 1082.09,713.88 1323.74,713.88 ; 1323.74,715.75 1697.65,715.75 1837.99,575.41 2544.35,575.41 pad.32 2843.76,874.82 3883.66,874.82 4353.74,874.82 4523.72,874.82 ; 1323.74,744.78 base.12@1323.74,3011.5 ; 1404.59,2941.3 1406.17,2939.72 3223.49,2939.72 3292.68,3008.91 3292.68,3350.21 ; VIN_PDB.1@4555.28,554.8 4555.28,843.27
GRPR_L_3.3V: logic_level_shifter2.6 Pico.17 | length 365.4
  Bottom Layer w39.37: logic_level_shifter2.6@5316.18,3707.24 5366,3707.24 5505.45,3846.69 5557.4,3898.64 5573.17,3898.64 5584.49,3909.96 Pico.17
  Bottom Layer w47.24: logic_level_shifter2.6 logic_level_shifter2.6@5316.18,3707.24
GRPR_L_5V: logic_level_shifter2.15 Roll_grpr_driver.8 | length 2097.2
  Bottom Layer w47.24: Roll_grpr_driver.8 4646.93,2064.8 4748.9,2064.8 4997.28,2313.19 4997.28,2413.73 4999.33,2415.78 4999.33,2740.59 4860.11,2879.8 4756.42,2879.8 4715.31,2920.9 4715.31,3165.78 4713.62,3167.48 4713.62,3660.08 4753.99,3700.45 4805.93,3700.45 logic_level_shifter2.15@4810.29,3704.8
GRPR_R_3.3V: logic_level_shifter2.7 Pico.16 | length 365.4
  Bottom Layer w51.18: logic_level_shifter2.7 5317.34,3808.4 5357.57,3808.4 5554.57,4005.4 5589.58,4005.4 Pico.16
GRPR_R_5V: logic_level_shifter2.14 Roll_grpr_driver.9 | length 2241.6
  Bottom Layer w51.18: Roll_grpr_driver.9 4649.19,2169.74 4739.7,2169.74 4916.57,2346.62 4916.57,2447.16 4918.62,2449.21 4918.62,2707.16 4830.62,2795.16 4634.43,2795.16 4604.45,2825.14 4604.45,3774.82 4634.43,3804.8 logic_level_shifter2.14
NetD1_A: D1.A relay_5V.A2 T1.1 | length 1630.2
  Bottom Layer w47.24: relay_5V.A2 4988.58,1300.4 5525.35,1837.17 5525.35,1906.42 5525.35,2146.52 D1.A ; D1.A@5402.46,2263.52 D1.A@5403.74,2264.8 ; D1.A@5415.12,2263.52 5431.5,2279.9 T1.1@5431.5,2505.01
NetD1_K: D1.K relay_5V.A1 | length 621.1
  Bottom Layer w47.24: relay_5V.A1 4988.58,1735.87 5206.65,1953.94 5407.15,1953.94 D1.K
NetGRPR_OUT_1: GRPR_OUT.1 pad.26 Roll_grpr_driver.1 | length 867
  Top Layer w118.11: GRPR_OUT.1 pad.26 pad.26@3003.74,654.8
  Bottom Layer w118.11: pad.26 3033.74,669.8 3552.4,669.8 Roll_grpr_driver.1
NetGRPR_OUT_2: GRPR_OUT.2 pad.27 Roll_grpr_driver.2 | length 874.5
  Top Layer w118.11: GRPR_OUT.2 pad.27@3738.74,349.8
  Bottom Layer w118.11: pad.27 3743.74,661.14 Roll_grpr_driver.2
NetLED_5V_A: LED_5V.A R_VIN.1 | length 280.8
  Bottom Layer w118.11: R_VIN.1 4107.46,418.52 4136.98,418.52 4190.04,471.59 4190.04,501.1
NetR_relay_1: R_relay.1 T1.2 | length 301.7
  Bottom Layer w47.24: R_relay.1 5231.61,2439.52 T1.2@5356.9,2564.8
PITCH_3.3V: logic_level_shifter1.8 Pico.4 | length 302.5
  Bottom Layer w51.18: logic_level_shifter1.8 5295.43,5206.49 5590.66,5206.49 Pico.4
PITCH_5V: 3PIN_servo_pitch.1 logic_level_shifter1.13 pad.16 | length 11053.3
  Top Layer w66.93: 3PIN_servo_pitch.1@878.74,324.8 271.91,324.8 130.08,466.64 130.08,5576.14 499.76,5945.83 3922.72,5945.83 pad.16
  Bottom Layer w66.93: pad.16 4615.82,5235.08 4654.75,5196.14 4680.78,5196.14 4733.71,5196.14 4742.34,5204.76 4782.32,5204.76 4782.36,5204.8 logic_level_shifter1.13
roll_encoder_A_3.3V: logic_level_shifter2.5 Pico.19 | length 325.3
  Bottom Layer w51.18: logic_level_shifter2.5 5432.39,3604.8 5474.33,3646.74 5474.33,3649.02 5530.72,3705.4 5589.58,3705.4 Pico.19
roll_encoder_A_5V: logic_level_shifter2.16 pad.47 roll_encoder.5 | length 4230.4
  Top Layer w51.18: pad.47 6497.95,2989.02 6672.65,2989.02 6753.26,2908.4 6797.75,2908.4 roll_encoder.5@6801.35,2904.8
  Bottom Layer w51.18: logic_level_shifter2.16 5040.29,3604.8 5070.28,3574.82 5070.28,3291.11 5774.41,2586.98 5774.41,1984.78 5804.39,1954.8 6348.76,1954.8 6378.74,1984.78 6378.74,2969.81 6378.69,2969.86 6393.63,2984.8 pad.47
roll_encoder_B_3.3V: logic_level_shifter2.4 Pico.20 | length 368
  Bottom Layer w51.18: logic_level_shifter2.4 5564.15,3504.8 5589.58,3530.23 5589.58,3605.4 Pico.20
roll_encoder_B_5V: logic_level_shifter2.17 pad.35 roll_encoder.6 | length 4207.9
  Top Layer w51.18: pad.35 6738.25,2806.49 6802.05,2806.49 roll_encoder.6
  Bottom Layer w51.18: logic_level_shifter2.17 4935.51,3504.8 4987.6,3452.72 4987.6,3256.87 5691.73,2552.73 5691.73,1874.78 5721.71,1844.8 6447.45,1844.8 6477.43,1874.78 6477.43,2830.1 6527.91,2880.58 6602.13,2880.58 6611.35,2889.8 pad.35
ROLL_L_3.3V: logic_level_shifter2.8 Pico.15 | length 365.4
  Bottom Layer w40: logic_level_shifter2.8 5331.86,3904.8 5345.36,3918.31 5355.68,3918.31 5540.64,4103.26 5587.44,4103.26 Pico.15
ROLL_L_5V: logic_level_shifter2.13 Roll_grpr_driver.10 | length 2306.8
  Bottom Layer w51.18: Roll_grpr_driver.10 4649.19,2269.74 4722.77,2269.74 4833.9,2380.87 4833.9,2481.4 4835.95,2483.45 4835.95,2665.45 4792.85,2708.54 4551.56,2708.54 4521.57,2738.52 4521.57,3874.82 4551.56,3904.8 logic_level_shifter2.13
roll_out1: pad.38 roll_encoder.1 Roll_grpr_driver.14 | length 3440.8
  Top Layer w66.93: 6774.53,3364.8 6774.53,3334.02 roll_encoder.1
  Top Layer w118.11: pad.38 4515,2868.54 5081.03,2868.54 5117.64,2905.16 5384.33,2905.16 5862.52,3383.35 6085.19,3383.35 6212.39,3382.44 6466.8,3380.63 6594,3379.72 6735.99,3379.72 6774.53,3364.8
  Bottom Layer w118.11: Roll_grpr_driver.14 3757.8,3124.8 pad.38@4283.74,3124.8
roll_out2: pad.37 roll_encoder.2 Roll_grpr_driver.15 | length 3636.4
  Top Layer w60: 6717.63,3192.98 roll_encoder.2
  Top Layer w118.11: pad.37 4434.61,2718.94 5142.99,2718.94 5179.61,2755.55 5449.49,2755.55 5912.91,3218.98 6683.22,3218.98 6703.02,3199.17
  Bottom Layer w118.11: Roll_grpr_driver.15 3544.41,3094.27 3753.88,2884.8 pad.37@4278.74,2884.8
ROLL_R_3.3V: logic_level_shifter2.9 Pico.14 | length 365.4
  Bottom Layer w40: logic_level_shifter2.9 5319.48,4010.54 5345.69,4010.54 5353.46,4018.31 5354.57,4018.31 5539.52,4203.26 5587.44,4203.26 Pico.14
ROLL_R_5V: logic_level_shifter2.12 Roll_grpr_driver.11 | length 2343.7
  Bottom Layer w51.18: Roll_grpr_driver.11 4649.19,2369.74 4672.5,2369.74 4676.81,2374.06 4693.73,2374.06 4751.22,2431.54 4751.22,2515.65 4753.27,2517.7 4753.27,2591.95 4723.29,2621.93 4468.72,2621.93 4438.74,2651.91 4438.74,3974.82 4468.72,4004.8 logic_level_shifter2.12
scl_base: base_enc.2 pad.56 Pico.29 R_scl_base.1 | length 635.2
  Top Layer w51.18: pad.56 R_scl_base.1 6709.81,4889.8 6763.49,4914.78 6790.6,4941.89 6821.74,4941.89 6828.74,4949.8 base_enc.2
  Bottom Layer w51.18: Pico.29 6291.05,4716.59 6313.4,4713.12 pad.56
scl_elbow: elbow_enc.2 pad.51 Pico.36 R_scl_elbow.1 | length 1123.5
  Top Layer w51.18: pad.51 6576.69,3918.38 6559.52,3918.38 6482.99,3841.85 6482.99,3675.56 6483.74,3674.8 6596.12,3674.8 6618.2,3696.89 6721.88,3696.89 6729.96,3688.81 6748.97,3669.8 elbow_enc.2@6849.67,3669.8
  Bottom Layer w51.18: Pico.36 6358.76,4018.35 6388.74,3988.37 6388.74,3896.59 6418.72,3866.61 6505.39,3866.61 6565.71,3926.93 pad.51
scl_shoulder: pad.53 Pico.34 R_scl_shoulder.1 shoulder_enc.2 | length 613
  Top Layer w45: R_scl_shoulder.1@6599.26,4229.96 6599.26,4234.74 6606.98,4242.46 6615.91,4242.46 6626.58,4253.13 6759.85,4253.13 6804.84,4298.12 shoulder_enc.2@6813.62,4298.12
  Top Layer w51.18: pad.53 6582.32,4234.88 6587.24,4229.96 R_scl_shoulder.1@6602.99,4229.96 ; shoulder_enc.2@6813.62,4298.12 6847.05,4298.12 shoulder_enc.2
  Bottom Layer w51.18: Pico.34 6284.32,4222.9 6301.16,4222.9 6302.02,4223.76 6318.94,4223.76 6329.36,4234.17 pad.53
sda_base: base_enc.1 pad.57 Pico.30 R_sda_base.1 | length 651.1
  Top Layer w51.18: pad.57 6598.74,4779.8 6653.74,4779.8 6654.49,4780.56 6774.49,4780.56 6837.05,4843.12 base_enc.1@6837.05,4845.73
  Bottom Layer w51.18: Pico.30 6282.6,4615.51 6356,4615.51 6398.4,4615.51 6419.43,4616.29 6435.16,4632.03 pad.57
sda_elbow: elbow_enc.1 pad.50 Pico.37 R_sda_elbow.1 | length 1366.2
  Top Layer w51.18: pad.50 6683.52,3512.66 6683.52,3604.59 R_sda_elbow.1 ; 6718.74,3569.8 elbow_enc.1
  Bottom Layer w51.18: Pico.37 6277.91,3920.2 6139.67,3920.2 6109.68,3890.22 6109.68,3527.15 6139.67,3497.17 6608.76,3497.17 6660.23,3497.17 6675.51,3512.44 pad.50
sda_shoulder: pad.52 Pico.35 R_sda_shoulder.1 shoulder_enc.1 | length 606.5
  Top Layer w51.18: pad.52 6545.55,4125.56 6774.49,4125.56 shoulder_enc.1
  Bottom Layer w51.18: Pico.35 6286.21,4118.35 6292.47,4124.6 6535.47,4124.6 pad.52
SHLDR_LPWM_3.3V: logic_level_shifter1.5 Pico.9 | length 381.1
  Bottom Layer w51.18: logic_level_shifter1.5 5297.34,4901.2 5369.13,4901.2 5555.81,4714.52 5589.58,4714.52 Pico.9
SHLDR_LPWM_5V: logic_level_shifter1.16 shoulder.1 | length 5486.7
  Bottom Layer w51.18: shoulder.1 687.07,3428.76 673.76,3428.76 672.42,3427.42 622.11,3427.42 592.13,3457.4 592.13,4434.82 623.72,4466.42 3982.9,4466.42 4421.29,4904.8 logic_level_shifter1.16
SHLDR_RPWM_3.3V: logic_level_shifter1.4 Pico.10 | length 381.1
  Bottom Layer w51.18: logic_level_shifter1.4 5297.34,4801.2 5352.2,4801.2 5538.89,4614.52 5589.58,4614.52 Pico.10
SHLDR_RPWM_5V: logic_level_shifter1.17 shoulder.2 | length 5114.8
  Bottom Layer w51.18: shoulder.2@681.5,3528.82 shoulder.2@688.35,3528.82 ; shoulder.2@690.51,3533.54 690.51,4349.82 720.49,4379.8 4018.78,4379.8 4443.78,4804.8 logic_level_shifter1.17
SHOULDER_M+: M_SHLDR.2 pad.21 shoulder.10 | length 6799.7
  Top Layer w118.11: pad.21 922.91,5314.53 922.91,4643.68 992.1,4574.49 2147.47,4574.49 2216.65,4505.3 2216.65,1970.57 1818.74,1572.66 1818.74,669.8 1903.74,584.8 M_SHLDR.2
  Bottom Layer w118.11: shoulder.10 910.23,5734.66 916.44,5588.25 918.58,5537.9 923.43,5423.55 pad.21
SHOULDER_M-: M_SHLDR.1 pad.19 shoulder.9 | length 7202.8
  Top Layer w118.11: pad.19 722.56,5317.4 722.56,4490.45 791.75,4421.26 1734.55,4421.26 1815.83,4339.99 1815.83,3051.73 1088.27,2324.17 1088.27,1671.67 1157.46,1602.48 1584.55,1602.48 1653.74,1533.29 1653.74,404.8 M_SHLDR.1
  Bottom Layer w118.11: shoulder.9 717.82,5726.36 714.52,5538.81 712.46,5421.72 pad.19
sol_out: pad.28 relay_5V.NO sol_out.2 | length 3470.2
  Top Layer w118.11: sol_out.2 2753.74,800.62 2822.93,869.8 5458.74,869.8 pad.28 pad.28@5463.74,864.8
  Bottom Layer w118.11: pad.28@5468.9,874.96 relay_5V.NO
SOLENOID_3.3V: logic_level_shifter1.9 Pico.1 | length 385.4
  Bottom Layer w51.18: logic_level_shifter1.9 5295.43,5306.49 5356.45,5306.49 5555.36,5505.4 5589.58,5505.4 Pico.1@5594.13,5509.96
SOLENOID_5V: logic_level_shifter1.12 pad.41 pad.67 R_relay.2 | length 3054.1
  Top Layer w51.18: pad.67 5032.4,4335.67 5058.74,4362 pad.41
  Bottom Layer w51.18: logic_level_shifter1.12 4794.25,5304.29 4903.74,5304.29 5018.27,5304.29 5048.26,5274.31 5048.26,4392.83 pad.41 ; pad.67 5069.06,3008.84 5112.48,3006.09 5127.6,2990.97 5225.55,2892.94 5225.55,2622.13 5231.61,2616.07 R_relay.2
pads on no net: base. base.5 base.6 elbow. elbow.5 elbow.6 logic_level_shifter2.2 logic_level_shifter2.3 logic_level_shifter2.18 logic_level_shifter2.19 Pico.2 Pico.5 Pico.8 Pico.13 Pico.18 Pico.22 Pico.24 Pico.25 Pico.26 Pico.31 Pico.33 Pico.38 Pico.40 relay_5V.NC Roll_grpr_driver. Roll_grpr_driver.5 shoulder. shoulder.5 shoulder.6

## Silkscreen, mask and mechanical layers (free items; w line width, h text height)
Top Overlay:
  text "3.3V" at 5243.74,5524.8 h27.56
  text "5V" at 4768.74,5519.8 h27.56
  text "A" at 5318.86,4263.74 h60
  text "B" at 4718.74,4254.8 h60
  text "VA" at 5429.49,3159.37 h60
  text "VB" at 4575,3151.93 h60
  text "E" at 5488.74,2624.8 h35.43
  text "B" at 5258.74,2539.8 h35.43
  text "C" at 5508.74,2459.8 h35.43
  text "NC" at 5438.74,1719.8 h35.43
  text "NO" at 5443.74,1004.8 h35.43
  text "in" at 5463.74,699.8 h35.43
  text "+" at 4140,364.57 h60
  text "+" at 5798.74,251.68 h78.74
  text "+" at 6428.74,251.68 h78.74
Bottom Overlay:
  text "3V3" at 6984.02,5333.43 h35.43 r269.78
  text "GND" at 6983.69,5189.59 h27.56 r270.37
  text "dir" at 6983.58,5071.45 h27.56 r269.75
  text "scl" at 6984.55,4977.3 h27.56 r270.33
  text "sda" at 6985.72,4873.16 h27.56 r269.83
  text "roll+" at 6983.47,3305.81 h19.68 r359.26
  text "roll-" at 6989.07,3202.43 h19.68 r359.48
  text "5V" at 6990.14,3091.71 h27.56 r359.89
  text "GND" at 6991.88,2996.59 h27.56 r359.39
  text "A" at 7002.37,2899.92 h27.56 r0.65
  text "B" at 7004.16,2803.12 h27.56 r1.17
  text "signal" at 844.96,181.65 h35.43 r270
  text "VCC" at 957.15,173.8 h35.43 r270.37
  text "GND" at 1081,173.76 h35.43 r270.11
  text "+" at 2998.74,113.9 h35.43
  text "+" at 2338.74,108.9 h35.43
  text "+" at 2753.74,108.9 h35.43
  text "+" at 1473.74,103.9 h35.43
  text "+" at 1918.74,103.9 h35.43
Mechanical 1:
  the board outline again, w10

## Text inside footprints (layer, text, board x,y; h text height)
base: Top Overlay "LPWM" at 608.86,658.37 h27.56 r90; Top Overlay "RPWM" at 608.86,779.43 h27.56 r90
"Buck converter": Top Overlay "In+" at 5828.74,854.8 h60 r90
elbow: Top Overlay "LPWM" at 2901.73,3380.93 h27.56 r90; Top Overlay "RPWM" at 2901.73,3501.99 h27.56 r90
Pico: Top Overlay "USB" at 5847.13,5345.87 h60
shoulder: Top Overlay "LPWM" at 599.72,3376.85 h27.56 r90; Top Overlay "RPWM" at 599.72,3497.91 h27.56 r90